# EAGLE board switch_reversed (EAGLE 6.6.0)

No outline drawn. Coordinates in mm, seen from the top.
Copper layers used: 

## Footprints (pad centres in the part's own frame; a part is rotated, then mirrored left to right if it is on the bottom)
HDR2 = smd 0.8 x 0.8: 1 0,0; 2 1.2,0
SOT23-3 = smd 0.8 x 0.8: D 2.4,0; G 0,0; S 1.2,0
R0603 = smd 0.8 x 0.8: 1 0,0; 2 1.2,0
DIP28 = smd 0.8 x 0.8: 1 0,0; 2 1.2,0; 3 2.4,0; 4 3.6,0; 5 4.8,0; 6 6,0; 7 7.2,0; 8 8.4,0; 9 9.6,0; 10 10.8,0; 11 12,0; 12 13.2,0; 13 14.4,0; 14 15.6,0; 15 16.8,0; 16 18,0; 17 19.2,0; 18 20.4,0; 19 21.6,0; 20 22.8,0; 21 24,0; 22 25.2,0; 23 26.4,0; 24 27.6,0; 25 28.8,0; 26 30,0; 27 31.2,0; 28 32.4,0

## Placement (x,y rotation side)
J1  PWR  [HDR2]  0,0 0 top
Q1  AO3401A  [SOT23-3]  10,0 0 top
R1  100k  [R0603]  20,0 0 top
R2  1k  [R0603]  30,0 0 top
U1  ATMEGA328P  [DIP28]  40,0 0 top

## Library data of the parts
J1 Q1 R1 R2 U1 = device

## Nets
GATE: Q1.G R1.1 U1.2
GND: J1.2 R2.2 U1.8
VIN: J1.1 Q1.D R1.2 U1.7
VSW: Q1.S R2.1